# Altium PCB Transmitter_PCB_V4.0.PcbDoc (part 3 of 3)
Units mm, origin at the board's own origin, x right, y up, seen from the top; angles counter-clockwise.
Board outline 50 x 50 mm, 2 copper layers (Top Layer, Bottom Layer), stack 1.448 mm thick; 146 components, 102 nets, 432 pads, 97 vias.
Unrouted connection lines stored in the file: 102.
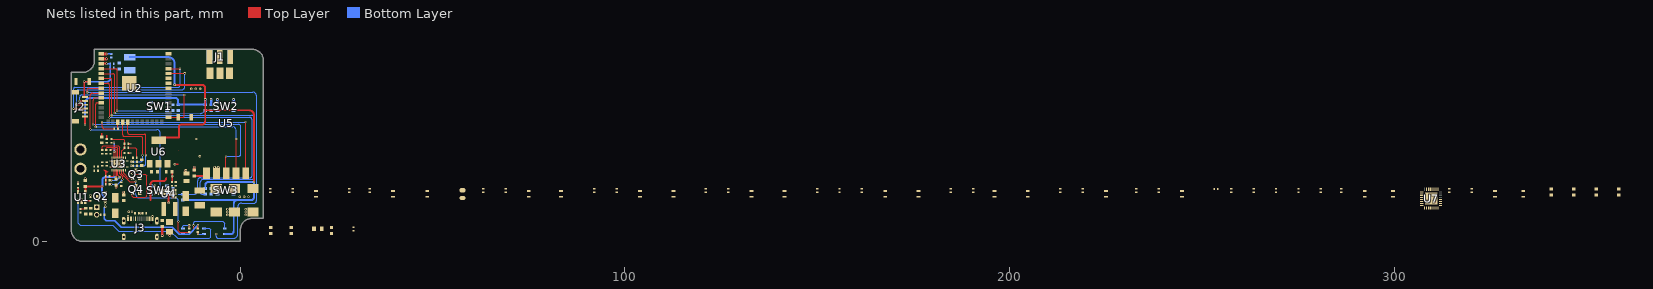
[diagram p2: the nets of this part, all layers, seen from the top]

## Part data (continued)
U6: "SOT-223 Linear Voltage Regulators (LDO) ROHS", LCSC Part Number=C2992570, Manufacturer="GUOXIN JIAPIN SEMICONDUCTOR", Package=SOT-223, ComponentLink1Description=LCSC, ComponentLink1URL=https://www.lcsc.com/product-detail/Linear-Voltage-Regulators-LDO_GUOXIN-JIAPIN-SEMICONDUCTOR-AMS1117-3-3_C2992570.html, Item Type=IC, Manufacturer Part Number=AMS1117-3.3
U7: "IC XPNDR 400KHZ I2C SMBUS 32UQFN", Case/Package=QFN, Clock Frequency=400kHz, LCSC Part Number=C80692, Manufacturer="Texas Instruments", Max Operating Temperature=85°C, Max Supply Voltage=5.5V, Min Operating Temperature=-40°C, Min Supply Voltage=1.65V, Output Current=25mA, Supplier Part Number=595-TCA6424ARGJR, Category="Interface ICs", ComponentLink1Description=https://datasheet.ciiva.com/1600/tca6424a-1600866.pdf?src-supplier=Newark, ComponentLink1URL=https://datasheet.ciiva.com/1600/tca6424a-1600866.pdf?src-supplier=Newark, ComponentLink2Description=https://datasheet.ciiva.com/1496/1535173-1496151.pdf?src-supplier=Element14, ComponentLink2URL=https://datasheet.ciiva.com/1496/1535173-1496151.pdf?src-supplier=Element14, ComponentLink3Description=https://datasheet.ciiva.com/22652/1699435-22652096.pdf?src-supplier=Element14, ComponentLink3URL=https://datasheet.ciiva.com/22652/1699435-22652096.pdf?src-supplier=Element14, ComponentLink4Description=https://datasheet.ciiva.com/1780/tca6424a-1780437.pdf?src-supplier=Digikey, ComponentLink4URL=https://datasheet.ciiva.com/1780/tca6424a-1780437.pdf?src-supplier=Digikey, ComponentLink5Description=https://datasheet.ciiva.com/4826/scps193b-101393-4826180.pdf?src-supplier=Mouser, ComponentLink5URL=https://datasheet.ciiva.com/4826/scps193b-101393-4826180.pdf?src-supplier=Mouser, ComponentLink6Description=https://datasheet.ciiva.com/15134/getdatasheetpartid-254651-15134577.pdf?src-supplier=Verical, ComponentLink6URL=https://datasheet.ciiva.com/15134/getdatasheetpartid-254651-15134577.pdf?src-supplier=Verical, ComponentLink7Description=https://datasheet.ciiva.com/1505/1535173-1505147.pdf?src-supplier=Farnell, ComponentLink7URL=https://datasheet.ciiva.com/1505/1535173-1505147.pdf?src-supplier=Farnell, ComponentLink8Description=https://datasheet.ciiva.com/1780/tca6424a-1780438.pdf?src-supplier=Digikey, ComponentLink8URL=https://datasheet.ciiva.com/1780/tca6424a-1780438.pdf?src-supplier=Digikey, ComponentLink9Description=https://datasheet.ciiva.com/1780/tca6424a-1780439.pdf?src-supplier=Digikey, ComponentLink9URL=https://datasheet.ciiva.com/1780/tca6424a-1780439.pdf?src-supplier=Digikey, ComponentLink10Description=https://datasheet.ciiva.com/14195/tca6424a-14195387.pdf?src-supplier=Avnet, ComponentLink10URL=https://datasheet.ciiva.com/14195/tca6424a-14195387.pdf?src-supplier=Avnet, ComponentLink11Description=https://datasheet.ciiva.com/41460/001187873-da-01-en-ic-i-o-expander-tca6424argjr-uqfn-32-tid-41460550.pdf?src-supplier=Conrad, ComponentLink11URL=https://datasheet.ciiva.com/41460/001187873-da-01-en-ic-i-o-expander-tca6424argjr-uqfn-32-tid-41460550.pdf?src-supplier=Conrad, Frequency=400kHz, Height=0.6mm, Item Type=IC, Lead Free="Lead Free", Length=5.15mm, Manufacturer Part Number=TCA6424ARGJR, Number of I/Os=24, Number of Outputs=24, Output Type=PUSH-PULL, Packaging="Tape and Reel", Pins=32, Pricing="1=2.13, 10=1.81, 50=1.81, 100=1.54, 1000=1.05, 10000=0.894 (USD)", Radiation Hardening=No, Reach SVHC Compliant=No, RoHS=Yes, RoHS Compliant=Yes, Series=-, Stock=59506, Supplier=Mouser, Weight=0.002116oz, Width=5.15mm

## Via types
v1: diameter 0.6, hole 0.3, Top Layer to Bottom Layer, tented both sides, 97 vias

## Nets (pads, with @x,y where several pads share a name; then routed paths per layer and width w, separated by ;. In a path a pad name is that pad's centre, name@x,y a point inside that pad or via, vN(x,y) a via of type N, cw(c..) or ccw(c..) an arc to the next point about the centre after c; other vN are vias at no path point)
3V3_WIFI: C3.1 C4.2 C6.2 C36.2 C39.2 J2.1 R1.1 R3.1 R4.1 R5.1 R8.2 R36.2 R40.2 R43.1 R48.1 U2.2 U6.2 U6.4 U7.31 | length 174.1
  Top Layer w0.254: v1(-40.398,30.429) v1@-40.394,30.429
  Top Layer w0.508: v1@-40.394,30.429 J2.1@-40.394,32.498 ; U6.4@-21.267,26.342 -20.794,26.342 -20.771,26.365 -20.771,26.776 -20.473,27.073 -16.318,27.073 -16.304,27.087 -16.025,27.087 -16.021,27.091 -16.021,27.333 -16.021,28.959 -16.021,29.679 cw(c-15.271,29.679) -15.271,30.429 -10.008,30.429 ccw(c-10.008,31.293) -9.144,31.293 -9.144,34.125 ; v1@-16.891,40.742 v1(-17.08,40.742) -10.033,40.742 cw(c-10.033,39.861) -9.152,39.861 v1(-9.152,36.957) -9.144,36.957 -9.144,34.125 ; v1(3.505,15.469) 3.512,15.469 3.512,32.901 ccw(c2.288,32.901) 2.288,34.125 -9.144,34.125
  Top Layer w0.762: U2.2@-36.172,47.498 v1(-34.798,47.498)
  Bottom Layer w0.508: v1(-40.398,30.429) -40.398,35.934 cw(c-38.989,35.934) -38.989,37.343 -16.975,37.343 cw(c-16.975,36.538) -16.171,36.538 R1.1@-16.171,35.562 -9.152,35.562 R3.1@-9.152,35.571 ; C3.1@-28.829,47.928 -18.769,47.928 cw(c-18.769,46.24) -17.08,46.24 v1(-17.08,40.742) ; R5.1@-15.008,10.759 2.799,10.759 ccw(c2.799,11.466) 3.505,11.466 v1(3.505,15.469) -8.284,15.469 ccw(c-8.284,14.608) -9.144,14.608 R4.1@-9.144,13.82 ; -4.064,1.925 -2.477,1.925 ccw(c-2.477,2.675) -1.727,2.675 -1.727,9.921 cw(c-0.889,9.921) -1.168,10.711
  Bottom Layer w0.635: R3.1@-9.152,35.571 -9.152,35.617 -9.144,35.626 -9.144,36.949 v1(-9.152,36.957)
+5V: C15.2 D1.1 D3.2 R11.2 R31.2 R35.1 R39.1
ANT: J1.1 U5.6
BUTTON: U2.8 | length 96.3
  Top Layer w0.254: v1(-39.853,38.786) -39.853,39.368 cw(c-39.353,39.368) -39.353,39.868 U2.8@-36.182,39.868
  Bottom Layer w0.254: v1(-39.853,38.786) 3.266,38.786 cw(c3.266,37.86) 4.191,37.86 4.191,10.648 cw(c3.513,10.648) 3.513,9.97 0.338,9.97 ccw(c0.338,8.895) -0.737,8.895 -0.737,1.829 cw(c-1.727,1.829) -1.727,0.838 -5.791,0.838 cw(c-5.791,1.339) -6.292,1.339 v1(-6.292,1.925)
BUTTON1: C5.1 R1.2 SW1.1 SW1.2 U2.4 | length 23.7
  Top Layer w0.254: U2.4@-36.182,44.948 -32.461,44.948 cw(c-32.461,44.567) -32.08,44.567 -32.08,34.02 v1(-32.088,34.013)
  Bottom Layer w0.254: v1(-32.088,34.013) -32.075,34.026 -23.345,34.026 -23.337,34.034 -23.332,34.03 -23.271,34.03 SW1.1@-23.262,34.038
BUTTON2: C7.1 R3.2 SW2.1 SW2.2 U2.5 | length 37.3
  Top Layer w0.254: U2.5@-36.182,43.678 -33.235,43.678 cw(c-33.235,43.156) -32.713,43.156 v1(-32.713,33.422)
  Bottom Layer w0.254: v1(-32.713,33.422) -32.338,33.408 -10.371,33.27 ccw(c-10.371,34.052) -9.818,33.499 -9.461,33.784 R3.2@-9.144,34.038
BUTTON3: C8.1 R4.2 SW3.1 SW3.2 U2.6 | length 83.8
  Top Layer w0.254: U2.6@-36.182,42.408 -33.867,42.408 cw(c-33.867,41.958) -33.417,41.958 v1(-33.417,32.863)
  Bottom Layer w0.254: v1@-33.417,32.817 1.04,32.817 2.918,32.817 cw(c2.918,32.179) 3.556,32.179 3.556,16.71 cw(c2.965,16.71) 2.965,16.12 -9.661,16.12 ccw(c-9.661,15.342) -10.439,15.342 -10.439,12.769 ccw(c-9.966,12.769) -9.966,12.296 R4.2@-9.144,12.296
BUTTON4: C9.1 R5.2 SW4.1 SW4.2 U2.7 | length 85.9
  Top Layer w0.254: U2.7@-36.182,41.138 -34.486,41.138 cw(c-34.486,40.688) -34.036,40.688 v1(-34.036,32.258)
  Bottom Layer w0.254: v1(-34.036,32.258) 2.476,32.258 cw(c2.476,31.712) 3.022,31.712 3.022,17.038 cw(c2.612,17.038) 2.612,16.628 -10.255,16.628 ccw(c-10.255,15.732) -11.151,15.732 -11.151,13.219 cw(c-12.074,13.219) -12.074,12.296 -16.171,12.296
EN: R34.1 U2.9 | length 46.7
  Top Layer w0.152: -19.918,13.381 -19.893,13.356
  Top Layer w0.254: v1@-38.989,29.083 v1(-38.989,29.108) -38.989,38.07 -38.989,38.071 cw(c-38.457,38.071) -38.455,38.603 -38.453,38.603 U2.9@-36.436,38.598
  Top Layer w0.508: -21.21,13.381 -19.918,13.381
  Bottom Layer w0.254: v1(-38.989,29.108) -21.788,29.108 cw(c-21.788,28.133) -20.812,28.133 v1(-20.812,13.387)
EN1: R28.2 U2.19 U3.10 | length 19.3
  Top Layer w0.203: U2.19@-29.332,30.998 -29.332,28.319 ccw(c-28.919,28.319) -28.919,27.906 -24.973,27.906 cw(c-24.973,27.503) -24.569,27.503 v1(-24.569,22.461)
  Bottom Layer w0.203: v1(-28.408,19.679) -25.171,19.679 ccw(c-25.171,20.28) -24.569,20.28 v1(-24.569,22.461) v1@-24.569,22.479
EN2: R27.1 U2.18 U3.11 | length 17.9
  Top Layer w0.203: U2.18@-30.602,30.998 -30.602,27.749 ccw(c-30.158,27.749) -30.158,27.305 -25.847,27.305 cw(c-25.847,26.891) -25.433,26.891 v1(-25.433,22.438)
  Bottom Layer w0.203: v1(-28.423,20.702) -25.963,20.702 ccw(c-25.963,21.232) -25.433,21.232 v1(-25.433,22.438)
GND: C1.2 C2.2 C3.2 C4.1 C5.2 C6.1 C7.2 C8.2 C9.2 C10.2 C11.1 C12.1 C13.1 C14.1 C15.1 C16.1 C17.1 C18.1 C19.1 C20.2 C27.1 C28.1 C33.1 C34.2 C35.2 C36.1 C37.1 C38.1 C39.1 C40.1 J1.2 J1.3 J1.4 J1.5 J2.2 J2.MP1 J2.MP2 J3.A1/B12 J3.B1/A12 J4.2 R13.1 R14.1 R15.2 R16.1 R17.2 R19.1 R21.1 R24.1 R25.2 R27.2 R28.1 R54.1 SW1.3 SW1.4 SW2.3 SW2.4 SW3.3 SW3.4 SW4.3 SW4.4 SW6.2 SW7.2 U1.2 U2.1 U2.40 U2.41 U3.1 U3.20 U3.21 U4.2 U5.2 U5.7 U5.8 U6.1 U7.25 U7.33 | length 27.7
  Top Layer w0.152: U3.21@-32.738,19.401 v1(-32.465,19.674) ; U3.21@-32.686,20.901 v1(-32.465,20.679)
  Top Layer w0.254: R13.1@-42.228,14.926 R13.1@-42.225,14.922 ; U3.1@-33.745,19.401 U3.21@-32.738,19.401 ; U3.20@-33.745,20.901 U3.21@-32.686,20.901 ; R16.1@-22.279,13.394 R16.1@-22.267,13.381
  Top Layer w0.381: R13.1@-42.228,14.926 v1(-42.228,15.444) ; R13.1@-42.225,14.922 R13.1@-42.224,14.924 ; v1(-41.277,10.833) -41.275,10.831 -41.275,10.312 U1.2@-41.273,10.311 ; v1(-40.337,16.37) v1@-40.335,16.368 ; v1(-38.98,12.022) v1@-38.978,12.02 ; C13.1@-38.978,11.502 C13.1@-38.977,11.5 ; C27.1@-36.042,27.202 -36.042,28.169 ; C28.1@-34.747,26.619 -34.747,27.583 ; v1(-32.333,14.031) v1(-32.333,14.031) ; R25.2@-29.192,23.006 v1(-28.557,23.006) ; R24.1@-29.192,25.359 v1(-28.557,25.359) ; R16.1@-22.279,13.394 -22.258,13.415 -22.258,14.452 v1(-22.25,14.46) ; v1@-18.354,1.551 v1(-18.352,1.55) ; R19.1@-17.789,15.441 -17.769,15.461 -17.769,16.979 v1(-17.755,16.993) -17.755,18.109 C38.1@-17.759,18.109 ; v1(-17.05,20.098) -16.172,20.098 ; -16.092,23.587 -16.084,23.596
  Top Layer w0.508: v1(-18.644,10.033) -18.644,12.069 -18.306,12.406 U4.2@-17.273,12.406
  Top Layer w0.635: C11.1@-40.335,15.85 v1@-40.335,16.368 ; v1(-32.333,14.031) C17.1@-32.335,14.551 ; C19.1@-30.37,12.3 v1@-30.37,12.818 ; v1(-20.32,1.524) -20.32,3.873 R21.1@-20.31,3.873 ; v1@-18.354,1.551 C16.1@-18.354,2.07 ; C15.1@-14.175,17.727 v1(-14.175,18.501) ; C1.2@-11.989,18.567 v1(-11.989,19.341)
  Top Layer w0.762: U2.1@-36.172,48.768 v1(-34.798,48.768)
  Bottom Layer w0.254: SW4.3@-23.263,14.446 SW4.3@-23.256,14.453 ; SW2.3@-5.977,36.197 SW2.3@-5.968,36.188 ; SW2.4@-1.776,36.197 SW2.4@-1.768,36.188
  Bottom Layer w0.381: v1(-34.798,48.768) C4.1@-33.634,48.768
  Bottom Layer w0.508: SW4.3@-23.256,14.453 -23.248,14.445 -23.24,14.453 -22.257,14.453 v1(-22.25,14.46)
  Bottom Layer w0.635: C7.2@-7.62,35.562 v1(-7.62,36.957) ; SW2.3@-5.977,36.197 -5.969,36.205 v1(-5.969,36.957) ; v1(-1.778,36.957) -1.778,36.198 SW2.4@-1.776,36.197
  other v1: -29.235,6.531 -22.835,6.531 -3.389,6.928 1.397,6.928 -25.921,7.372 -3.389,7.655 1.397,7.655 -3.389,8.382 1.397,8.382 -0.178,11.633 0.965,11.633 2.108,11.633 -30.372,12.82 -6.706,19.295 -5.775,19.295 -31.595,19.674 -30.725,19.674 -31.595,20.679 -30.725,20.679 -12.759,39.675 -11.616,39.675 -10.473,39.675
HC_RX: TP?.2 U2.10 U5.3 | length 62.8
  Top Layer w0.254: v1(-38.329,30.429) -38.329,36.726 cw(c-37.726,36.726) -37.726,37.328 U2.10@-36.436,37.328 ; v1(-3.755,22.112) -3.755,17.801 U5.3@-3.688,17.734
  Bottom Layer w0.254: v1@-38.075,30.429 -0.457,30.429 cw(c-0.457,29.87) 0.102,29.87 0.102,22.748 cw(c-0.522,22.748) -0.522,22.125 v1@-3.755,22.125
  other v1: -10.541,22.125
HC_TX: TP?.1 U2.11 U5.4 | length 55.5
  Top Layer w0.254: v1@-37.639,29.798 -37.639,35.627 cw(c-37.208,35.627) -37.208,36.058 U2.11@-36.182,36.058 ; v1@-11.525,26.651 v1(-11.506,26.67) ; U5.4@-1.148,17.734 -1.118,17.764 v1(-1.118,26.67)
  Bottom Layer w0.254: v1@-37.389,29.794 -1.946,29.794 cw(c-1.946,28.966) -1.118,28.966 v1(-1.118,26.67)
  other v1: -37.643,29.794
ILIM: R18.2 R23.2 R24.2 U3.14 | length 8.4
  Top Layer w0.203: U3.14@-30.845,21.801 -30.845,23.537 R23.2@-30.247,24.134
  Top Layer w0.254: R18.2@-33.52,26.619 -30.36,26.619 -30.132,26.391 R24.2@-30.132,25.359 R23.2@-30.132,24.325 R23.2@-30.132,24.236 ; R23.2@-30.247,24.134 -30.233,24.134 -30.139,24.229 R23.2@-30.139,24.243
IO_P00: R37.2 U7.1
IO_P01: R41.2 U7.2
IO_P02: R46.2 U7.3
IO_P03: R50.2 U7.4
IO_P04: R52.2 U7.5
IO_P05: R55.2 U7.6
IO_P06: R57.2 U7.7
IO_P07: R59.2 U7.8
IO_P10: R61.2 U7.9
IO_P11: R63.2 U7.10
IO_P12: R38.1 U7.11
IO_P13: R42.1 U7.12
IO_P14: R47.1 U7.13
IO_P15: R51.1 U7.14
IO_P16: R53.1 U7.15
IO_P17: R56.1 U7.16
IO_P20: R58.1 U7.17
IO_P21: R60.1 U7.18
IO_P22: R62.1 U7.19
IO_P23: R64.1 U7.20
IO_RST: R49.1 U2.33
NetC1_1: C1.1 C10.1 C34.1 C35.1 D3.1 U5.1 | length 3.5
  Top Layer w0.254: U5.1@-9.458,17.043 U5.1@-8.768,17.734
  Top Layer w0.508: C1.1@-11.989,17.043 U5.1@-9.458,17.043
NetC16_2: C16.2 J3.S1 J3.S2 J3.S3 J3.S4 R21.2
NetC21_1: C21.1 C22.1 C23.1 C24.2 C25.2 C26.2 C32.2 U3.2 | length 5.8
  Top Layer w0.152: -35.244,18.563 -35.244,18.426 -35.516,18.698 -35.255,18.545 -35.166,18.493 -34.528,18.121 -34.922,18.121 -34.968,18.075
  Top Layer w0.254: -35.244,18.426 -34.991,18.173
  Top Layer w0.381: C22.1@-34.998,14.874 -34.998,15.946 C23.1@-34.998,17.014 ; C23.1@-34.991,17.014 -34.991,18.173
NetC21_2: C21.2 U3.5 | length 5
  Top Layer w0.203: U3.5@-31.845,18.501 -31.845,17.223 v1(-31.345,16.723)
  Top Layer w0.254: C21.2@-34.052,15.947 C21.2@-34.049,15.951
  Top Layer w0.381: C21.2@-34.052,15.947 C21.2@-34.051,15.946 ; C21.2@-34.049,15.951 v1(-33.53,15.951)
  Bottom Layer w0.254: v1(-33.53,15.951) -32.117,15.951 v1(-31.345,16.723)
NetC22_2: C22.2 U3.6 | length 6.6
  Top Layer w0.203: U3.6@-31.345,18.501 -31.345,17.558 -30.657,16.87 v1(-30.657,16.137)
  Top Layer w0.254: C22.2@-34.06,14.875 C22.2@-34.057,14.879
  Top Layer w0.381: C22.2@-34.06,14.875 C22.2@-34.058,14.874 ; C22.2@-34.057,14.879 v1(-33.538,14.879)
  Bottom Layer w0.254: v1(-33.538,14.879) -31.916,14.879 v1(-30.657,16.137)
NetC23_2: C23.2 U3.3 | length 2.6
  Top Layer w0.203: C23.2@-34.109,17.014 -33.095,17.014 -32.845,17.264 U3.3@-32.845,18.501
NetC24_1: C24.1 C25.1 L3.2
NetC26_1: C26.1 C29.1 C30.1 C31.1 C32.1 L3.1 U3.19
NetC29_2: C29.2 U3.17 | length 3.9
  Top Layer w0.203: C29.2@-33.774,23.763 -33.647,23.89 -33.554,23.89 -33.298,24.146 -32.542,24.146 -32.235,23.838 -32.235,23.111 -32.345,23.001 U3.17@-32.345,21.801
NetC30_2: C30.2 U3.15 | length 8.4
  Top Layer w0.203: C30.2@-35.922,23.763 -35.922,24.625 -35.639,24.908 -31.801,24.908 -31.345,24.452 U3.15@-31.345,21.801
NetC31_2: C31.2 U3.16 | length 6.1
  Top Layer w0.203: C31.2@-34.834,23.763 -34.834,24.302 -34.609,24.527 -32.215,24.527 -31.845,24.157 U3.16@-31.845,21.801
NetC38_2: C38.2 R31.1 R32.1 U6.3
NetD1_2: D1.2 L2.2 U4.1
NetJ3_A5: J3.A5 R15.1
NetJ3_B5: J3.B5 R17.1
NetLED2_1: LED2.1 R10.1 | length 2
  Top Layer w0.508: v1(-11.049,1.925) R10.1@-11.049,2.381
  Bottom Layer w0.254: v1(-11.049,1.925) LED2.1@-9.5,1.925
NetLED2_2: LED2.2 U1.1 | length 46.7
  Top Layer w0.381: v1(-42.227,10.833) -42.225,10.831 -42.225,10.312 U1.1@-42.223,10.311
  Bottom Layer w0.254: v1(-42.227,10.833) -42.227,4.802 -41.657,4.233 -33.161,4.233 -31.641,2.712 -18.188,2.712 -16.25,0.774 -8.071,0.774 -7.747,1.098 -7.747,3.061 -8.111,3.425 LED2.2@-9.5,3.425
NetLED4_2: LED4.2 R63.1 | length 11.2
  Top Layer w0.254: -12.192,3.378 -12.182,3.388 -12.182,4.172 v1(-12.173,4.181)
  Bottom Layer w0.254: v1(-12.173,4.181) -12.173,4.845 -11.811,5.207 -4.564,5.207 -4.064,4.707 LED4.2@-4.064,3.425
NetLED5_2: LED5.2 R29.1 | length 3
  Top Layer w0.254: R29.1@-13.335,3.391 v1(-13.335,4.183)
  Bottom Layer w0.254: LED5.2@-14.935,3.425 -14.935,3.915 -14.667,4.183 v1(-13.335,4.183)
NetLED6_2: LED6.2 R38.2
NetLED7_2: LED7.2 R37.1
NetLED8_2: LED8.2 R42.2
NetLED9_2: LED9.2 R41.1
NetLED10_2: LED10.2 R47.2
NetLED11_2: LED11.2 R46.1
NetLED12_2: LED12.2 R51.2
NetLED13_2: LED13.2 R50.1
NetLED14_2: LED14.2 R53.2
NetLED15_2: LED15.2 R52.1
NetLED16_2: LED16.2 R56.2
NetLED17_2: LED17.2 R55.1
NetLED18_2: LED18.2 R58.2
NetLED19_2: LED19.2 R57.1
NetLED20_2: LED20.2 R60.2
NetLED21_2: LED21.2 R59.1
NetLED22_2: LED22.2 R62.2
NetLED23_2: LED23.2 R61.1
NetLED24_2: LED24.2 R64.2
NetQ3_1: Q3.1 Q4.1 U3.8 | length 17.9
  Top Layer w0.203: U3.8@-30.345,18.501 -30.345,17.726 -29.112,16.493 Q3.1@-28.087,16.493
  Top Layer w0.254: Q4.1@-28.087,12.538 -28.134,12.491 -28.134,11.779 -27.842,11.488 -24.709,11.488 -24.384,11.812 -24.384,17.142 -24.735,17.493 -27.137,17.493 -28.087,16.543 Q3.1@-28.087,16.493
NetQ3_2: Q3.2 Q4.2
NetR11_1: R11.1 R19.2 U4.3
NetR13_2: R13.2 U1.5 | length 1.2
  Top Layer w0.381: U1.5@-42.225,12.832 R13.2@-42.225,13.983
NetR16_2: R16.2 R33.1 R34.2 U4.4
NetR20_2: R20.2 U2.17 | length 1.7
  Top Layer w0.254: R20.2@-31.877,29.337 -31.877,30.993 U2.17@-31.872,30.998
NetR22_1: R22.1 U3.12
NetR22_2: R22.2 R23.1 | length 4.6
  Top Layer w0.254: R23.1@-29.192,24.325 -27.325,24.325 -26.949,23.948 R22.2@-26.949,21.742
NetR25_1: R25.1 U3.13
NetR29_2: R29.2 U3.7 | length 31.5
  Top Layer w0.203: U3.7@-30.845,18.501 -30.845,17.603 -28.817,15.575 v1(-27.185,15.575)
  Top Layer w0.254: v1(-16.115,5.211) -16.129,5.198 -16.129,2.827 -15.734,2.432 -13.354,2.432 R29.2@-13.335,2.451
  Bottom Layer w0.254: v1(-27.185,15.575) -27.185,12.181 ccw(c-26.334,12.181) -26.334,11.329 -16.961,11.329 cw(c-16.961,10.484) -16.563,11.23 cw(c-16.961,10.484) -16.215,10.882 cw(c-16.961,10.484) -16.115,10.484 v1(-16.115,5.211)
NetR44_2: R44.2 U7.29
NetR45_2: R45.2 U7.30
NetR49_2: R49.2 U7.28
NetR54_2: R54.2 U7.26
RECT: C27.2 C28.2 R18.1 U3.18 | length 3.9
  Top Layer w0.203: U3.18@-32.845,21.801 v1@-32.845,23.321
  Bottom Layer w0.254: v1(-32.845,25.676) v1@-32.84,25.672 ; v1@-32.84,23.334 v1(-32.836,23.329)
  Bottom Layer w0.381: v1@-32.84,23.334 v1@-32.84,25.672
SCL: R43.2 R44.1 U2.34
SDA: R45.1 R48.2 U2.35
SET: R20.1 U5.5 | length 55.3
  Top Layer w0.254: v1(-35.966,31.039) -35.966,29.896 ccw(c-35.408,29.896) -35.408,29.337 R20.1@-32.792,29.337 ; v1(1.346,31.064) 1.346,17.78 U5.5@1.392,17.734
  Bottom Layer w0.254: v1(-35.966,31.039) -35.954,31.051 1.333,31.051 v1(1.346,31.064)
VBAT: C2.1 C12.2 C13.2 C33.2 J4.1 Q2.3 U1.3 | length 2.5
  Top Layer w0.254: C2.1@-41.575,8.445 C12.2@-40.469,8.445
  Top Layer w0.381: U1.3@-40.325,10.562 C13.2@-38.978,10.562
VCC: C11.2 C17.2 C18.2 D2.2 LED5.1 Q2.1 Q4.3 R2.2 R10.2 R14.2 U1.4 U3.4 | length 47.8
  Top Layer w0.254: D2.2@-32.912,6.947 D2.2@-32.487,7.373 ; R10.2@-11.049,3.391 -11.045,3.394 -11.045,4.18 v1(-11.042,4.183)
  Top Layer w0.381: v1(-32.345,16.723) U3.4@-32.345,18.501 U3.4@-32.345,18.687
  Top Layer w0.508: U1.4@-40.325,12.832 C11.2@-40.325,13.983
  Top Layer w0.635: C11.2@-40.321,14.157 C11.2@-40.191,14.287 ; C11.2@-40.198,14.287 v1(-35.98,14.287)
  Bottom Layer w0.381: v1(-35.141,9.042) -35.391,8.793 -35.391,5.865 -34.887,5.361 -32.691,5.361 -30.969,3.639 -17.678,3.639 -15.964,1.925 LED5.1@-14.935,1.925 -13.3,1.925 v1(-11.042,4.183)
  Bottom Layer w0.508: -35.369,11.563 -35.98,12.174 v1(-35.98,14.287) -35.878,14.389 -35.878,15.951 cw(c-35.107,15.951) -35.764,16.356 cw(c-35.107,15.951) -35.511,16.608 cw(c-35.107,15.951) -35.107,16.723 v1(-32.345,16.723)
  other v1: -35.155,9.906
VCC#: C14.2 C19.2 D2.1 L2.1 Q2.2 R32.2 R33.2 U4.5 | length 11.6
  Top Layer w0.152: U4.5@-19.918,12.381 U4.5@-19.893,12.406
  Top Layer w0.254: D2.1@-32.487,11.373 -32.487,11.334 D2.1@-31.764,10.611 ; C14.2@-21.327,12.381 U4.5@-19.918,12.381
  Top Layer w0.508: -23.356,10.803 -23.356,14.894 cw(c-22.556,14.894) -22.556,15.695 -20.074,15.695 ccw(c-20.074,16.486) -19.283,16.486
VCCP: C40.2 R39.2 R40.1 U7.27
VLED: LED4.1 LED6.1 LED7.1 LED8.1 LED9.1 LED10.1 LED11.1 LED12.1 LED13.1 LED14.1 LED15.1 LED16.1 LED17.1 LED18.1 LED19.1 LED20.1 LED21.1 LED22.1 LED23.1 LED24.1 R35.2 R36.1
VUSB: C20.1 J3.A4/B9 J3.B4/A9 Q3.3 R2.1 U3.9 | length 0.5
  Top Layer w0.254: -28.912,18.16 -28.766,18.306 -28.43,18.306
  other v1: -29.022,7.711 -28.191,7.711 -28.912,17.652 -28.087,17.652
WIFI_EN: C37.2 J2.6 R8.1 SW6.1 U2.3 | length 18.5
  Top Layer w0.254: U2.3@-36.182,46.218 U2.3@-36.172,46.228
  Top Layer w0.381: J2.6@-40.621,37.578 v1(-40.621,41.588) SW6.1@-39.308,41.588 ; J2.6@-40.385,37.561 J2.6@-40.367,37.578
  Top Layer w0.508: U2.3@-36.172,46.228 v1(-34.798,46.228)
  Bottom Layer w0.381: v1@-40.367,41.588 -34.542,41.588 ccw(c-34.542,42.268) -33.863,42.268 C37.2@-33.863,45.124 R8.1@-33.863,46.228 v1(-34.798,46.228)
WIFI_IO0: J2.5 SW7.1 U2.27 | length 39.8
  Top Layer w0.254: U2.27@-18.682,32.248 -16.178,32.248 -15.021,32.248 ccw(c-15.021,32.639) -14.63,32.639 -14.63,38.075 v1(-14.605,38.1)
  Top Layer w0.381: v1(-41.834,36.5) -41.808,36.526 -40.42,36.526 J2.5@-40.394,36.552
  Bottom Layer w0.254: v1(-41.834,36.5) -41.834,37.471 cw(c-41.204,37.471) -41.204,38.1 v1(-14.605,38.1)
WIFI_RXD0: J2.4 U2.36 | length 42
  Top Layer w0.254: U2.36@-18.682,43.678 -18.647,43.713 v1(-14.478,43.713)
  Top Layer w0.381: v1(-42.52,35.56) -42.516,35.556 -40.39,35.556 J2.4@-40.386,35.56
  Bottom Layer w0.254: v1(-42.52,35.56) -42.52,39.043 cw(c-42.153,39.043) -42.153,39.41 -15.357,39.41 ccw(c-15.357,40.289) -14.478,40.289 v1(-14.478,43.713)
WIFI_TXD0: J2.3 U2.37 | length 43.7
  Top Layer w0.254: J2.3@-40.394,34.552 J2.3@-40.385,34.561 ; U2.37@-18.682,44.948 v1(-15.685,44.948)
  Top Layer w0.381: v1(-43.358,34.544) -43.354,34.548 -40.398,34.548 J2.3@-40.385,34.561
  Bottom Layer w0.254: v1(-43.358,34.544) -43.358,39.76 cw(c-43.071,39.76) -43.071,40.047 -16.299,40.047 ccw(c-16.299,40.66) -15.685,40.66 v1(-15.685,44.948)
pads on no net: J3.A6 J3.A7 J3.A8 J3.B6 J3.B7 J3.B8 J3.MH U2.12 U2.13 U2.14 U2.15 U2.16 U2.20 U2.21 U2.22 U2.23 U2.24 U2.25 U2.26 U2.28 U2.29 U2.30 U2.31 U2.32 U2.38 U2.39 U4.6 U7.21 U7.22 U7.23 U7.24 U7.32
copper on no net: | length 6.1
  Top Layer w0.254: -12.192,2.438 -12.192,1.194 ccw(c-11.772,1.194) -11.772,0.774 -8.952,0.774 ccw(c-8.952,1.09) -8.636,1.09 -8.636,1.921

## Polygon pours and split planes (outlines as drawn)
VUSB on Bottom Layer "VUSB_L02_P005" (solid, pour order 5): -29.241,7.213 -27.422,7.213 -27.422,13.96 -27.422,18.015 -29.241,18.015
GND on Bottom Layer "GND_L02_P010" (solid, pour order 10): -44,3 -44,43.975 -41.008,43.975 -40.962,43.975 ccw(c-40.962,46.975) -37.962,46.975 -37.962,50 3,50 cw(c3,47) 6,47 6,6 3.046,6 3,6 ccw(c3,3) 0,3 0,0 -41,0 cw(c-41,3)
GND on Top Layer "GND_L01_P012" (solid, pour order 12): -44,3 -44,43.975 -41.008,43.975 -40.962,43.975 ccw(c-40.962,46.975) -37.962,46.975 -37.962,50 3,50 cw(c3,47) 6,47 6,6 3.046,6 3,6 ccw(c3,3) 0,3 0,0 -41,0 cw(c-41,3)
VUSB on Top Layer "VUSB_L01_P015" (solid, pour order 15): -29.965,18.953 -25.26,18.953 -25.26,17.264 -29.965,17.264
VCC on Top Layer "VCC_L01_P014" (solid, pour order 14): -32.789,17.142 -26.727,17.142 -26.727,14.087 -32.789,14.087
VUSB on Top Layer "VUSB_L01_P006" (solid, pour order 6): -28.135,7.048 -27.806,7.377 -27.806,8.128 -29.439,8.128 -29.439,6.799 -28.735,6.095 -28.735,3.567 -28.063,2.896 -24.041,2.896 -23.335,3.602 -23.335,6.531 -23.935,6.531 -23.935,4.437 -24.435,3.937 -27.626,3.937 -28.135,4.446
VCC on Top Layer "VCC_L01_P007" (solid, pour order 7): -35.615,11.19 -35.615,6.123 -31.637,6.123 -31.637,8.623 -34.695,8.623 -34.695,11.19
NetC16_2 on Top Layer "NETC16_2_L01_P009" (solid, pour order 9): -28.935,6.168 -28.935,3.511 -28.199,2.775 -24.019,2.775 -23.972,2.728 -23.154,3.546 -23.154,4.373 -23.135,4.392 -23.135,6.168 -21.71,6.168 -21.71,0.463 -30.36,0.463 -30.36,6.168
VCC# on Top Layer "VCC#_L01_P008" (solid, pour order 8): -21.538,12.716 -19.283,12.716 -19.283,6.568 -21.538,6.568
NetC26_1 on Top Layer "NETC26_1_L01_P004" (solid, pour order 4): -37.264,23.052 -37.264,26.059 -43.2,26.059 -43.2,21.021 -37.264,21.021 -37.264,20.392 -34.653,20.392 -34.653,23.052

## Other copper
Top Layer:
  rectangle net 3V3_WIFI: -23.167,26.661 -15.768,27.943
  rectangle net +5V: -15.008,11.815 -13.308,16.584
  rectangle net +5V: -15.008,9.676 -9.141,11.815
  rectangle net 3V3_WIFI: -22.017,16.383 -20.517,26.619
  rectangle net NetQ3_2: -26.451,12.078 -24.875,16.953
  rectangle net EN2: -28.766,20.386 -27.617,21.034
  rectangle net EN1: -28.766,19.326 -27.617,19.988
  rectangle net EN1: -29.745,19.267 -27.617,19.584
  rectangle net EN2: -29.745,20.717 -27.617,21.034
  rectangle net NetR22_1: -29.845,21.69 -27.897,21.952
  rectangle net VUSB: -26.149,18.033 -25.26,20.11
  rectangle net +5V: -17.09,15.187 -13.413,16.584
  rectangle net GND: -22.495,12.063 -22.038,13.699
  rectangle net GND: -37.383,6.63 -36.081,7.265
  rectangle net VCC#: -33.337,9.55 -20.764,10.992
  rectangle net NetD1_2: -17.883,6.568 -13.308,9.065
  rectangle net NetD1_2: -17.883,6.568 -16.401,11.766
  rectangle net NetR11_1: -17.883,13.046 -16.663,14.73
  rectangle net GND: -26.671,7.048 -25.176,7.683
  rectangle net NetC21_1: -37.264,18.052 -34.488,19.909
  rectangle net NetC21_1: -37.264,18.052 -33.225,18.801
  rectangle net VCC#: -35.615,11.593 -31.637,13.09
  rectangle net VBAT: -37.615,8.247 -36.683,12.145
  rectangle net VUSB: -29.965,18.033 -25.777,18.953
  rectangle net NetC21_1: -33.829,18.201 -33.225,18.801
  rectangle net VBAT: -40.625,8.255 -39.155,10.79
  rectangle net VBAT: -40.622,8.247 -37.383,9.647
  rectangle net GND: -39.28,11.273 -38.682,12.022
  rectangle net GND: -40.622,6.247 -37.383,7.647
  rectangle net NetC16_2: -21.71,4.861 -17.526,5.842
  rectangle net GND: -7.128,17.018 -5.328,19.797
  rectangle net GND: -7.742,6.455 4.743,8.852
  rectangle net NetC1_1: -10.262,12.428 -7.868,18.734
  rectangle net NetC1_1: -11.941,12.355 4.743,14.955
  region net GND: -1.898,49.731 -3.398,49.731 -3.398,42.234 -1.898,42.234
  rectangle net GND: -8.788,42.234 -7.298,49.731
  rectangle net ANT: -5.862,43.734 -4.836,47.881
  rectangle net NetC26_1: -33.9,21.501 -33.225,23.052
  rectangle net NetC26_1: -36.24,22.505 -33.225,23.052
  rectangle net NetR25_1: -30.465,21.501 -30.225,23.323
  rectangle net NetC26_1: -36.24,20.392 -34.396,23.052
  region net RECT: -36.487,26.059 -36.487,25.297 -32.465,25.297 -32.465,26.059
  rectangle net NetJ3_A5: -27.435,5.331 -27.135,7.683
  rectangle net NetJ3_B5: -24.435,5.331 -24.135,7.683
  rectangle net NetC24_1: -43.2,17.307 -37.746,20.507
Bottom Layer:
  rectangle net 3V3_WIFI: -33.152,45.91 -27.329,47.244
  rectangle net GND: -33.152,43.678 -27.329,45.441
  rectangle net 3V3_WIFI: -35.179,46.772 -27.329,48.209
  rectangle net VCC: -36.322,8.247 -34.417,14.879
  rectangle net BUTTON1: -23.788,33.688 -16.171,34.388
  region net BUTTON3: -1.527,12.646 -9.144,12.646 -9.144,11.946 -1.527,11.946
  rectangle net BUTTON4: -23.788,11.946 -15.008,12.646
  rectangle net BUTTON2: -9.588,33.657 -1.243,34.419

## Silkscreen, mask and mechanical layers (free items; w line width, h text height)
Top Overlay:
  lines w0.254: -43.651,16.891 -39.37,16.891 -39.37,26.059 -43.651,26.059 -43.651,16.891
  text "COIL" at -43.159,26.563 h1.02
Bottom Overlay:
  text "B+" at -35.136,7.746 h1.02
  text "B-" at -35.124,6.689 h1.02
Draft and Dimension:
  drawing of 191 lines, arcs and shapes, not listed
  text "Layer" at -43.669,108.712 h1.52
  text "Name" at -33.257,108.712 h1.52
  text "Material" at -9.642,108.712 h1.52
  text "Thickness" at 12.196,108.712 h1.52
  text "Constant" at 28.702,108.712 h1.52
  text "Board Layer Stack" at 43.176,108.712 h1.52
  text "Top Overlay" at -33.257,105.664 h1.52
  text "Top Solder" at -33.257,102.616 h1.52
  text "Solder Resist" at -9.642,102.616 h1.52
  text "3.00mil" at 12.196,102.616 h1.52
  text "3.5" at 28.702,102.616 h1.52
  text "1" at -43.669,99.568 h1.52
  text "Top Layer" at -33.257,99.568 h1.52
  text "10.00mil" at 12.196,99.568 h1.52
  text "Dielectric 1" at -33.257,96.52 h1.52
  text "FR-4" at -9.642,96.52 h1.52
  text "37.00mil" at 12.196,96.52 h1.52
  text "4.8" at 28.702,96.52 h1.52
  text "2" at -43.669,93.472 h1.52
  text "Bottom Layer" at -33.257,93.472 h1.52
  text "10.00mil" at 12.196,93.472 h1.52
  text "Bottom Solder" at -33.257,90.424 h1.52
  text "Solder Resist" at -9.642,90.424 h1.52
  text "3.00mil" at 12.196,90.424 h1.52
  text "3.5" at 28.702,90.424 h1.52
  text "Bottom Overlay" at -33.257,87.376 h1.52
  text "Total board thickness:" at -43.669,84.328 h1.52
  text "63.00mil" at 12.196,84.328 h1.52
Board Outline:
  lines w0.254: -44,43.975 -44,3 ccw(c-41,3) -41,0 0,0 0,2.954 ; -43.962,43.975 -41.008,43.975 ; -40.962,43.975 ccw(c-40.962,46.975) -37.962,46.975 ; -37.962,47.021 -37.962,49.975 ; -37.962,50 3,50 cw(c3,47) 6,47 6,6 3.046,6 ; 0,3 cw(c3,3) 3,6 ; -37.746,2.308 cw(c-36.746,2.308) -36.746,3.308 -33.92,3.308 cw(c-33.92,2.308) -32.92,2.308 cw(c-33.92,2.308) -33.92,1.308 -36.746,1.308 cw(c-36.746,2.308) -37.746,2.308 ; -16.636,47.73 ccw(c-15.636,47.73) -15.636,46.73 -12.81,46.73 ccw(c-12.81,47.73) -11.81,47.73 ccw(c-12.81,47.73) -12.81,48.73 -15.636,48.73 ccw(c-15.636,47.73) -16.636,47.73 ; -2,0 -2,0
Drill Drawing:
  circle w0.254: c35.703,52.001 r0.847
  lines w0.254: 34.856,56.657 36.55,56.657 35.703,54.964 34.856,56.657 ; 34.856,58.774 35.703,59.197 36.55,58.774 36.126,59.621 36.55,60.467 35.703,60.044 34.856,60.467 35.28,59.621 34.856,58.774 ; 34.856,63.007 35.28,63.007 35.703,62.584 36.126,63.007 36.55,63.007 36.126,63.431 36.55,63.854 36.126,63.854 35.703,64.277 35.28,63.854 34.856,63.854 35.28,63.431 34.856,63.007 ; 34.856,66.817 35.28,66.817 35.28,66.394 36.126,66.394 36.126,66.817 36.55,66.817 36.55,67.664 36.126,67.664 36.126,68.087 35.28,68.087 35.28,67.664 34.856,67.664 34.856,66.817 ; 34.856,70.204 34.856,70.627 35.28,71.051 34.856,71.474 34.856,71.897 35.28,71.897 35.703,71.474 36.126,71.897 36.55,71.897 36.55,71.474 36.126,71.051 36.55,70.627 36.55,70.204 36.126,70.204 35.703,70.627 35.28,70.204 34.856,70.204
  lines w0.381: 33.337,50.011 311.999,50.011 ; 33.337,72.871 311.999,72.871 ; 47.33,46.201 47.33,76.681 ; 62.312,46.201 62.312,76.681 ; 90.244,46.201 90.244,76.681 ; 103.093,46.201 103.093,76.681 ; 121.731,46.201 121.731,76.681 ; 159.82,46.201 159.82,76.681 ; 174.802,46.201 174.802,76.681 ; 193.745,46.201 193.745,76.681 ; 221.423,46.201 221.423,76.681 ; 243.109,46.201 243.109,76.681 ; 276.983,46.201 276.983,76.681 ; 33.337,46.201 311.999,46.201 311.999,76.681 33.337,76.681 33.337,46.201
  text "Symbol" at 35.623,74.014 h1.83
  text "Count" at 48.473,74.014 h1.83
  text "Hole Size" at 63.455,74.014 h1.83
  text "Plated" at 91.387,74.014 h1.83
  text "Hole Type" at 104.236,74.014 h1.83
  text "Drill Layer Pair" at 122.874,74.014 h1.83
  text "Via/Pad" at 160.963,74.014 h1.83
  text "Pad Shape" at 175.945,74.014 h1.83
  text "Template" at 194.888,74.014 h1.83
  text "Description" at 222.566,74.014 h1.83
  text "Hole Tolerance (+)" at 244.252,74.014 h1.83
  text "Hole Tolerance (-)" at 278.126,74.014 h1.83
  text "2" at 48.473,70.204 h1.52
  text "23.62mil (0.600mm)" at 63.455,70.204 h1.52
  text "PTH" at 91.387,70.204 h1.52
  text "Slot" at 104.236,70.204 h1.52
  text "Top Layer - Bottom Layer" at 122.874,70.204 h1.52
  text "Pad" at 160.963,70.204 h1.52
  text "Rounded" at 175.945,70.204 h1.52
  text "r90_170h60_140r45" at 194.888,70.204 h1.52
  text "2" at 48.473,66.394 h1.52
  text "23.62mil (0.600mm)" at 63.455,66.394 h1.52
  text "PTH" at 91.387,66.394 h1.52
  text "Slot" at 104.236,66.394 h1.52
  text "Top Layer - Bottom Layer" at 122.874,66.394 h1.52
  text "Pad" at 160.963,66.394 h1.52
  text "Rounded" at 175.945,66.394 h1.52
  text "(Mixed)" at 194.888,66.394 h1.52
  text "2" at 48.473,62.584 h1.52
  text "24.41mil (0.620mm)" at 63.455,62.584 h1.52
  text "NPTH" at 91.387,62.584 h1.52
  text "Round" at 104.236,62.584 h1.52
  text "Top Layer - Bottom Layer" at 122.874,62.584 h1.52
  text "Pad" at 160.963,62.584 h1.52
  text "Rounded" at 175.945,62.584 h1.52
  text "c0hn62" at 194.888,62.584 h1.52
  text "2" at 48.473,58.774 h1.52
  text "33.46mil (0.850mm)" at 63.455,58.774 h1.52
  text "PTH" at 91.387,58.774 h1.52
  text "Round" at 104.236,58.774 h1.52
  text "Top Layer - Bottom Layer" at 122.874,58.774 h1.52
  text "Pad" at 160.963,58.774 h1.52
  text "(Mixed)" at 175.945,58.774 h1.52
  text "(Mixed)" at 194.888,58.774 h1.52
  text "2" at 48.473,54.964 h1.52
  text "78.74mil (2.000mm)" at 63.455,54.964 h1.52
  text "PTH" at 91.387,54.964 h1.52
  text "Round" at 104.236,54.964 h1.52
  text "Top Layer - Bottom Layer" at 122.874,54.964 h1.52
  text "Pad" at 160.963,54.964 h1.52
  text "Rounded" at 175.945,54.964 h1.52
  text "(Mixed)" at 194.888,54.964 h1.52
  text "97" at 48.473,51.154 h1.52
  text "11.81mil (0.300mm)" at 63.455,51.154 h1.52
  text "PTH" at 91.387,51.154 h1.52
  text "Round" at 104.236,51.154 h1.52
  text "Top Layer - Bottom Layer" at 122.874,51.154 h1.52
  text "Via" at 160.963,51.154 h1.52
  text "Rounded" at 175.945,51.154 h1.52
  text "v60h30m0mx0" at 194.888,51.154 h1.52
  text "107 Total" at 48.473,47.344 h1.52
  text "Slot definitions :" at 35.623,43.662 h1.52
  text "Routed Path Length" at 61.854,43.662 h1.52
  text "= Calculated from tool start centre position to tool end centre position." at 89.862,43.662 h1.52
  text "Hole Length" at 61.854,41.122 h1.52
  text "= Routed Path Length + Tool Size = Slot length as defined in the PCB layout" at 79.451,41.122 h1.52

## Dimensions
0,0 to 3,50 on Draft and Dimension
-43.962,43.975 to 6,47 on Draft and Dimension

## Text inside footprints (layer, text, board x,y; h text height)
J3: Mechanical 13 "PCB Edge" at -27.373,0.598 h1.02
U5: Top Overlay "8" at -2.403,40.738 h1 r90; Top Overlay "7" at -7.458,40.938 h1 r90; Top Overlay "6" at -4.994,40.738 h1 r90; Top Overlay "5" at 1.878,19.333 h1 r90; Top Overlay "4" at -0.803,19.377 h1 r90; Top Overlay "3" at -3.241,19.352 h1 r90; Top Overlay "2" at -5.832,19.377 h1 r90; Top Overlay "1" at -8.374,19.579 h1 r90